# Altium PCB ArmBand-Control-Board.PcbDoc (part 1 of 3)
Units mil, origin at the board's own origin, x right, y up, seen from the top; angles counter-clockwise.
Board outline 1771.65 x 1771.65 mil, 2 copper layers (Top Layer, Bottom Layer), stack 34 mil thick; 107 components, 81 nets, 408 pads, 170 vias.
Unrouted connection lines stored in the file: 5.
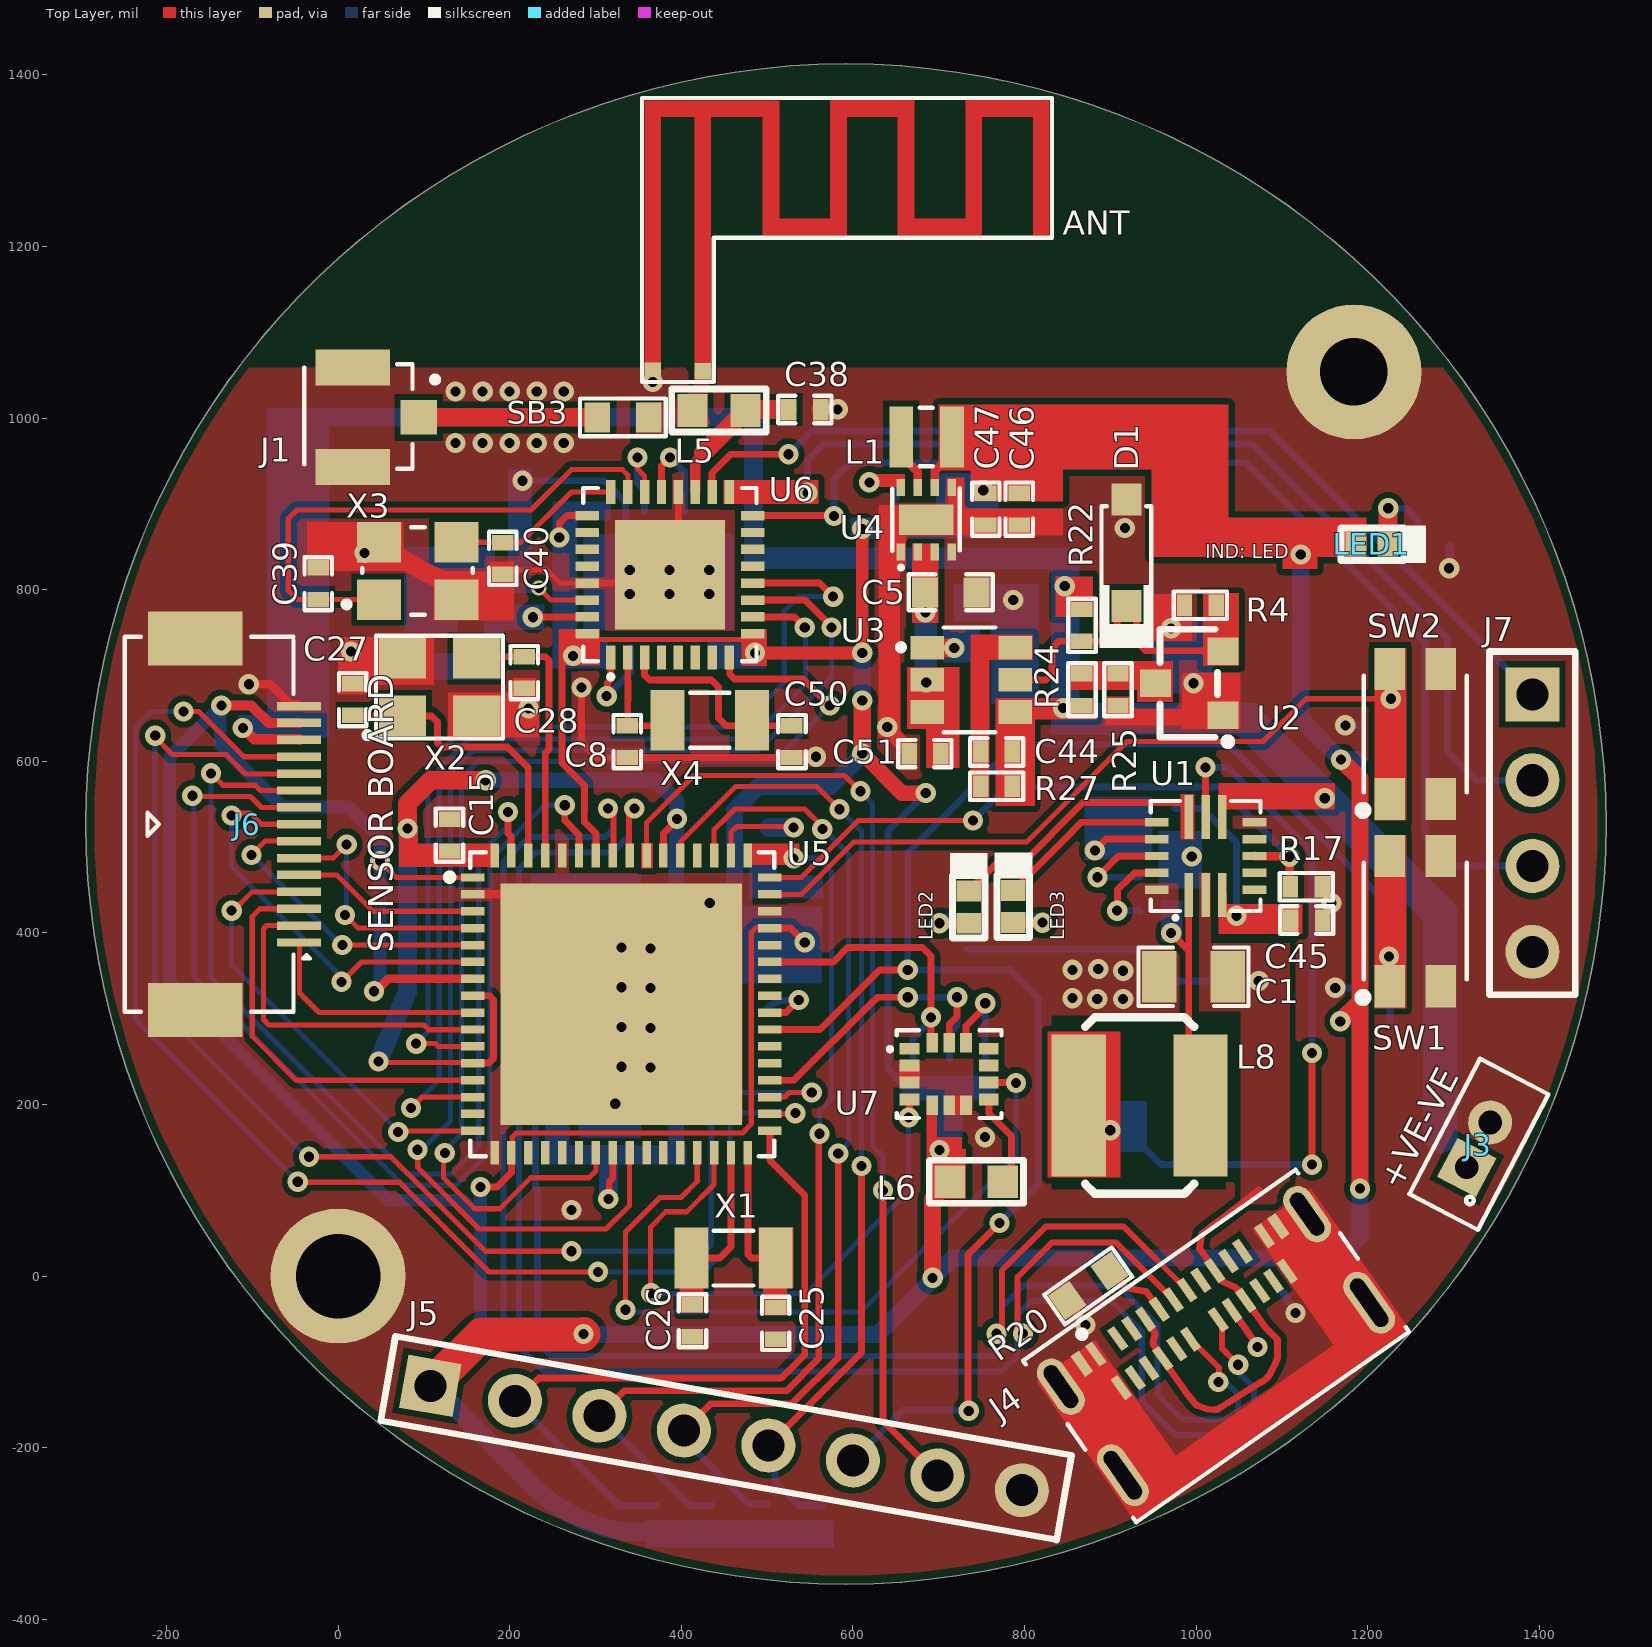
[diagram p0: Top Layer view]
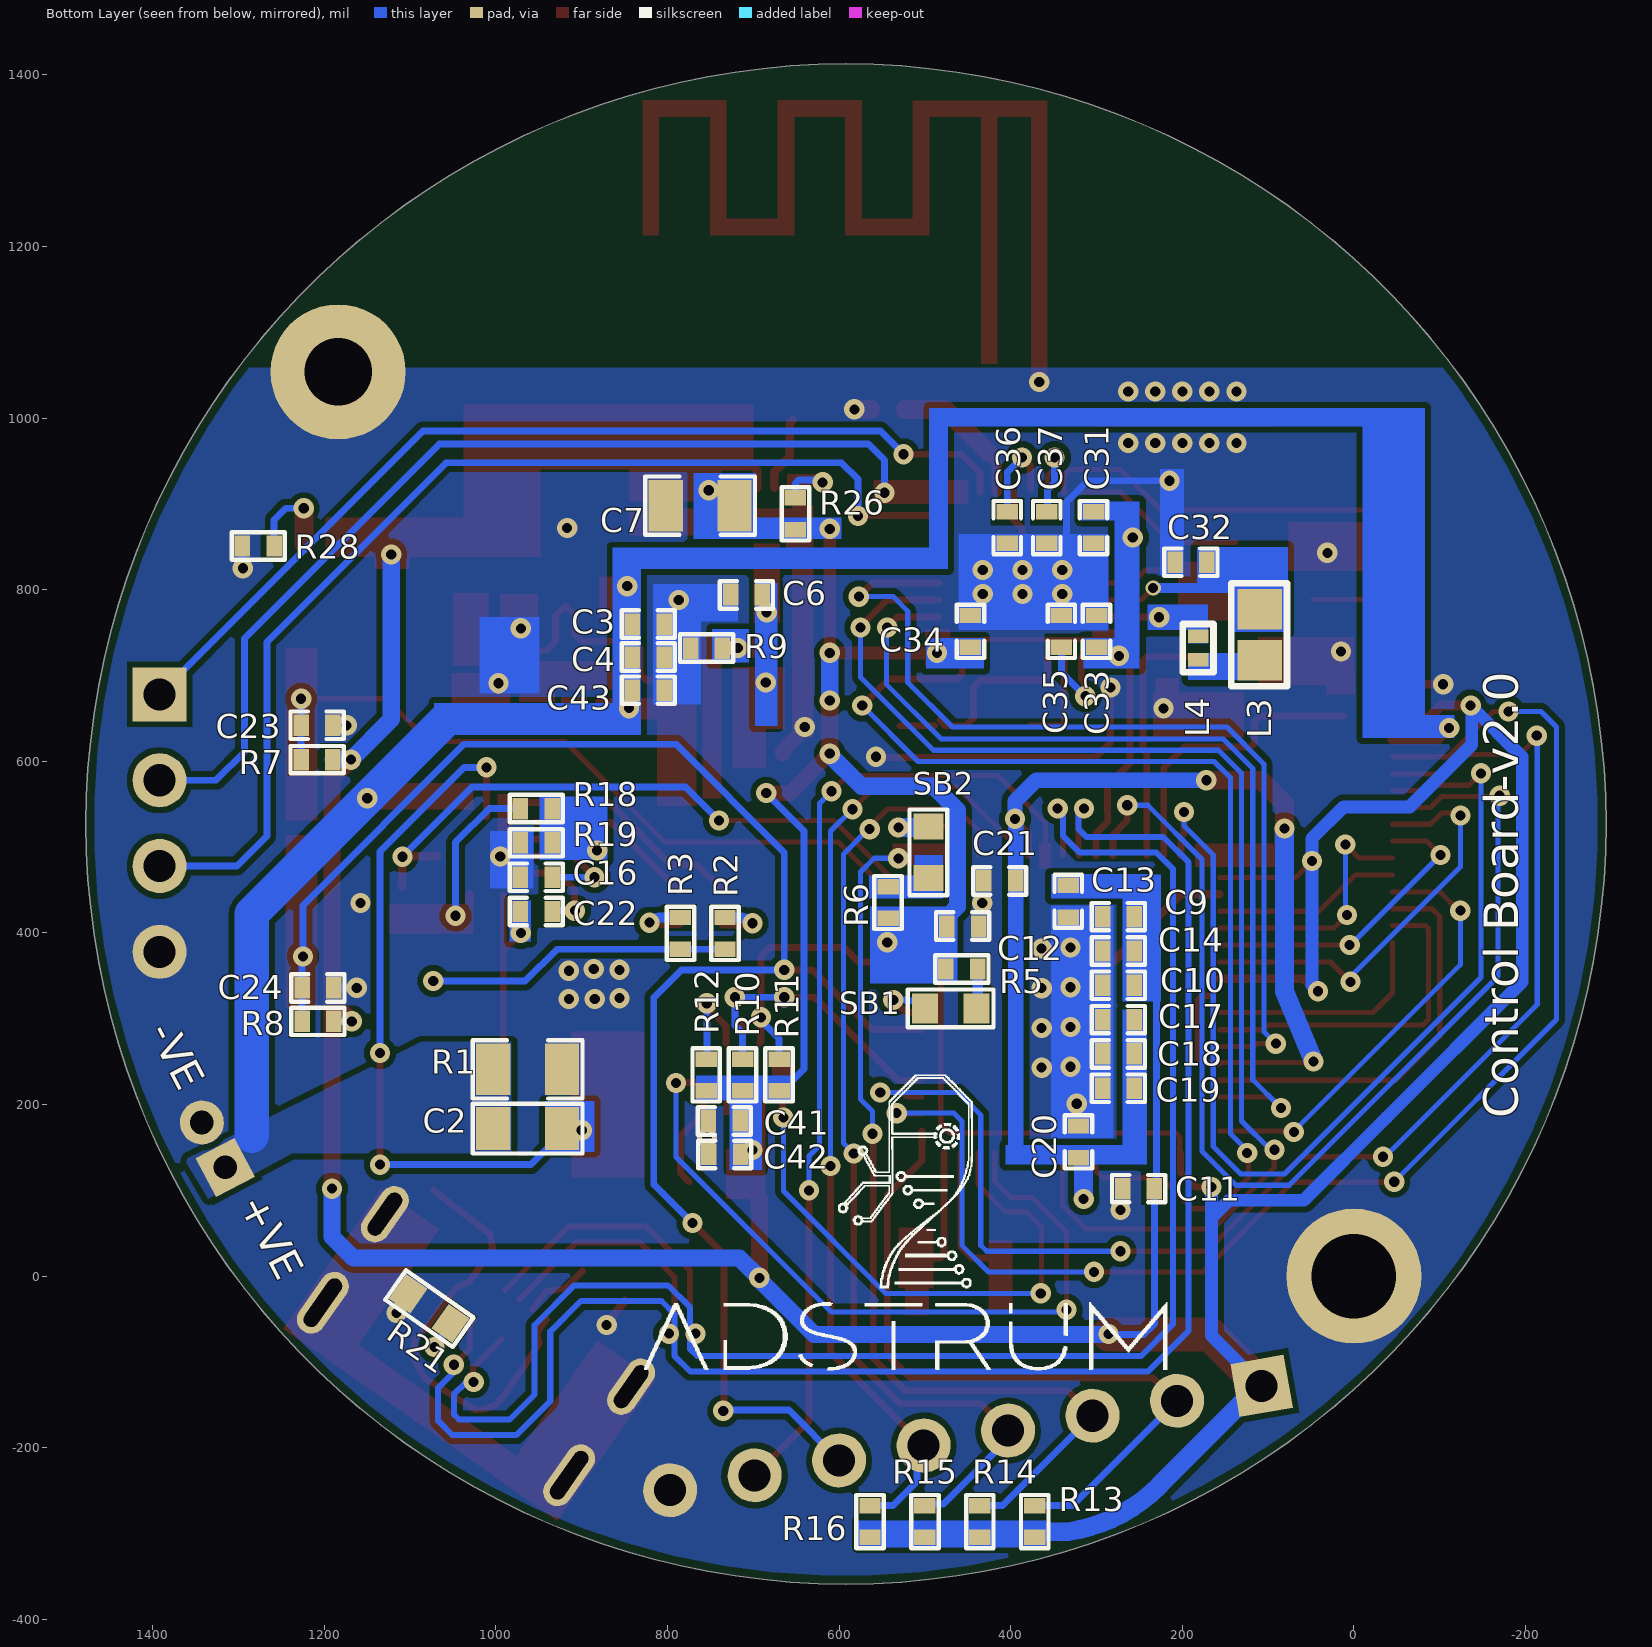
[diagram p1: Bottom Layer view, seen from below]
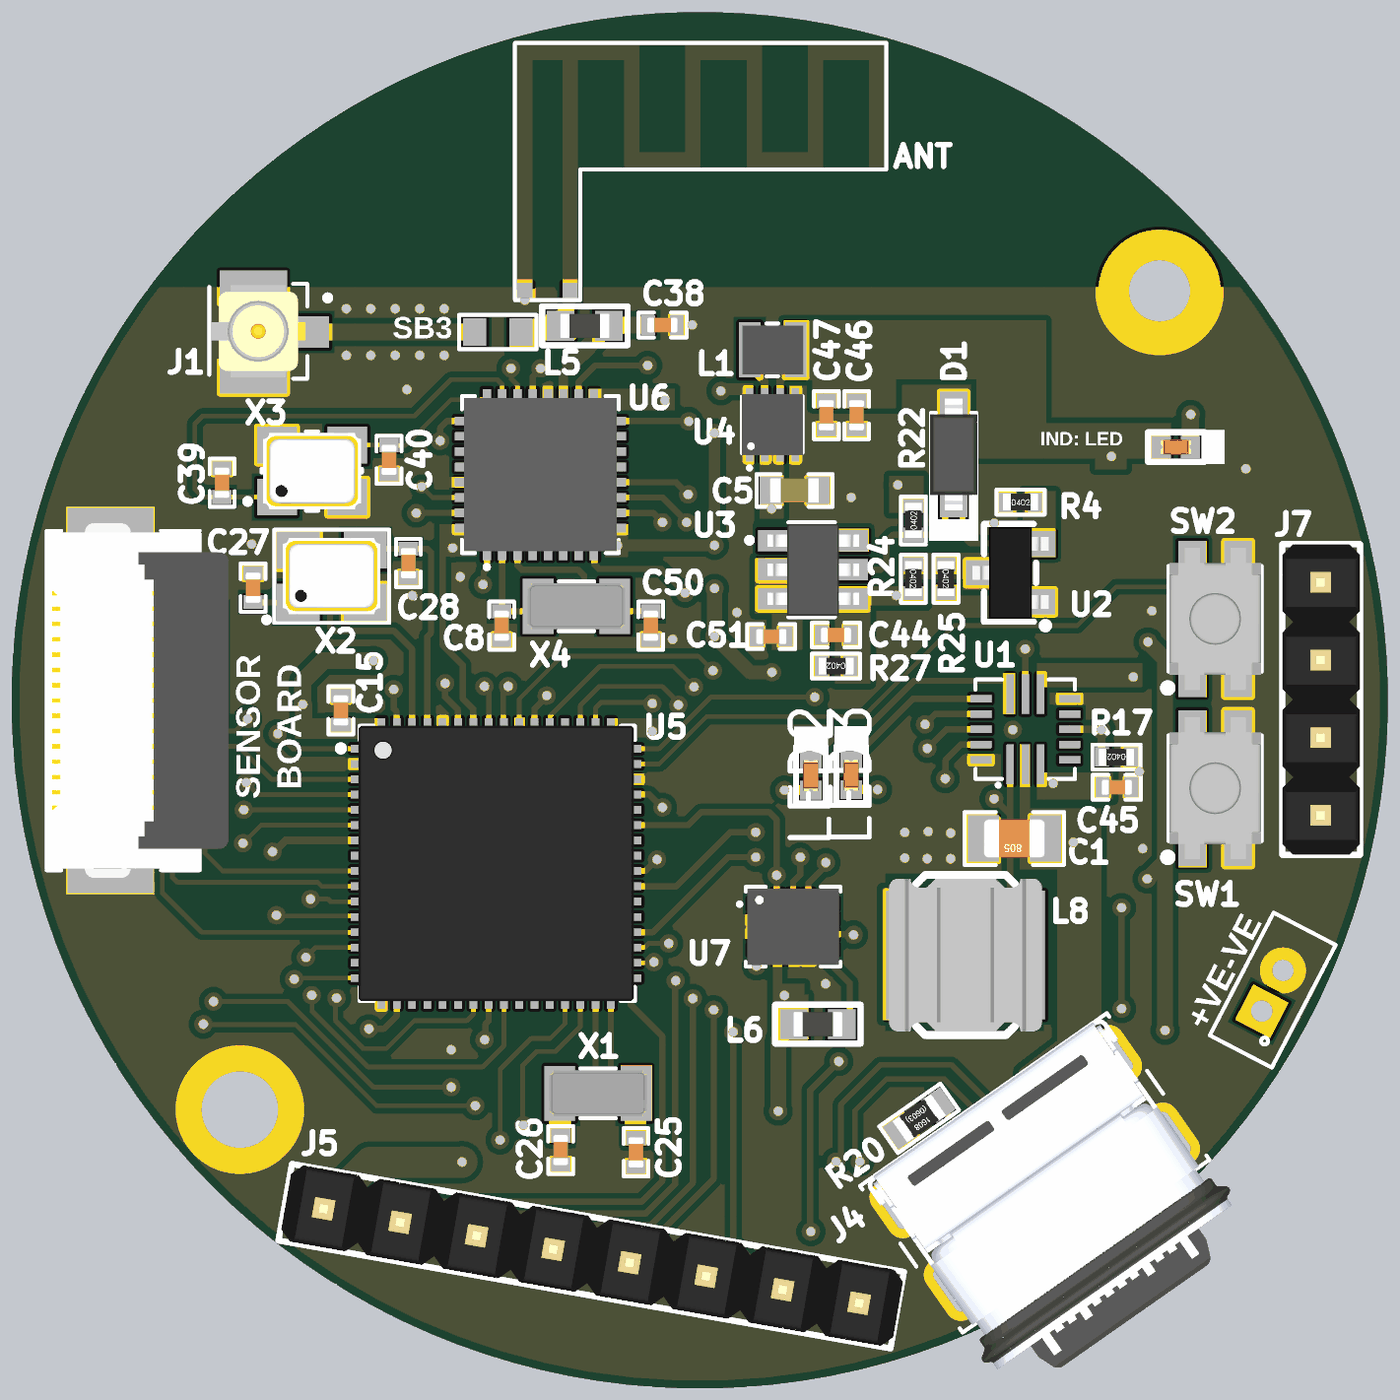
[diagram p3: 3D render of the assembled board from above, using the file's embedded part models]
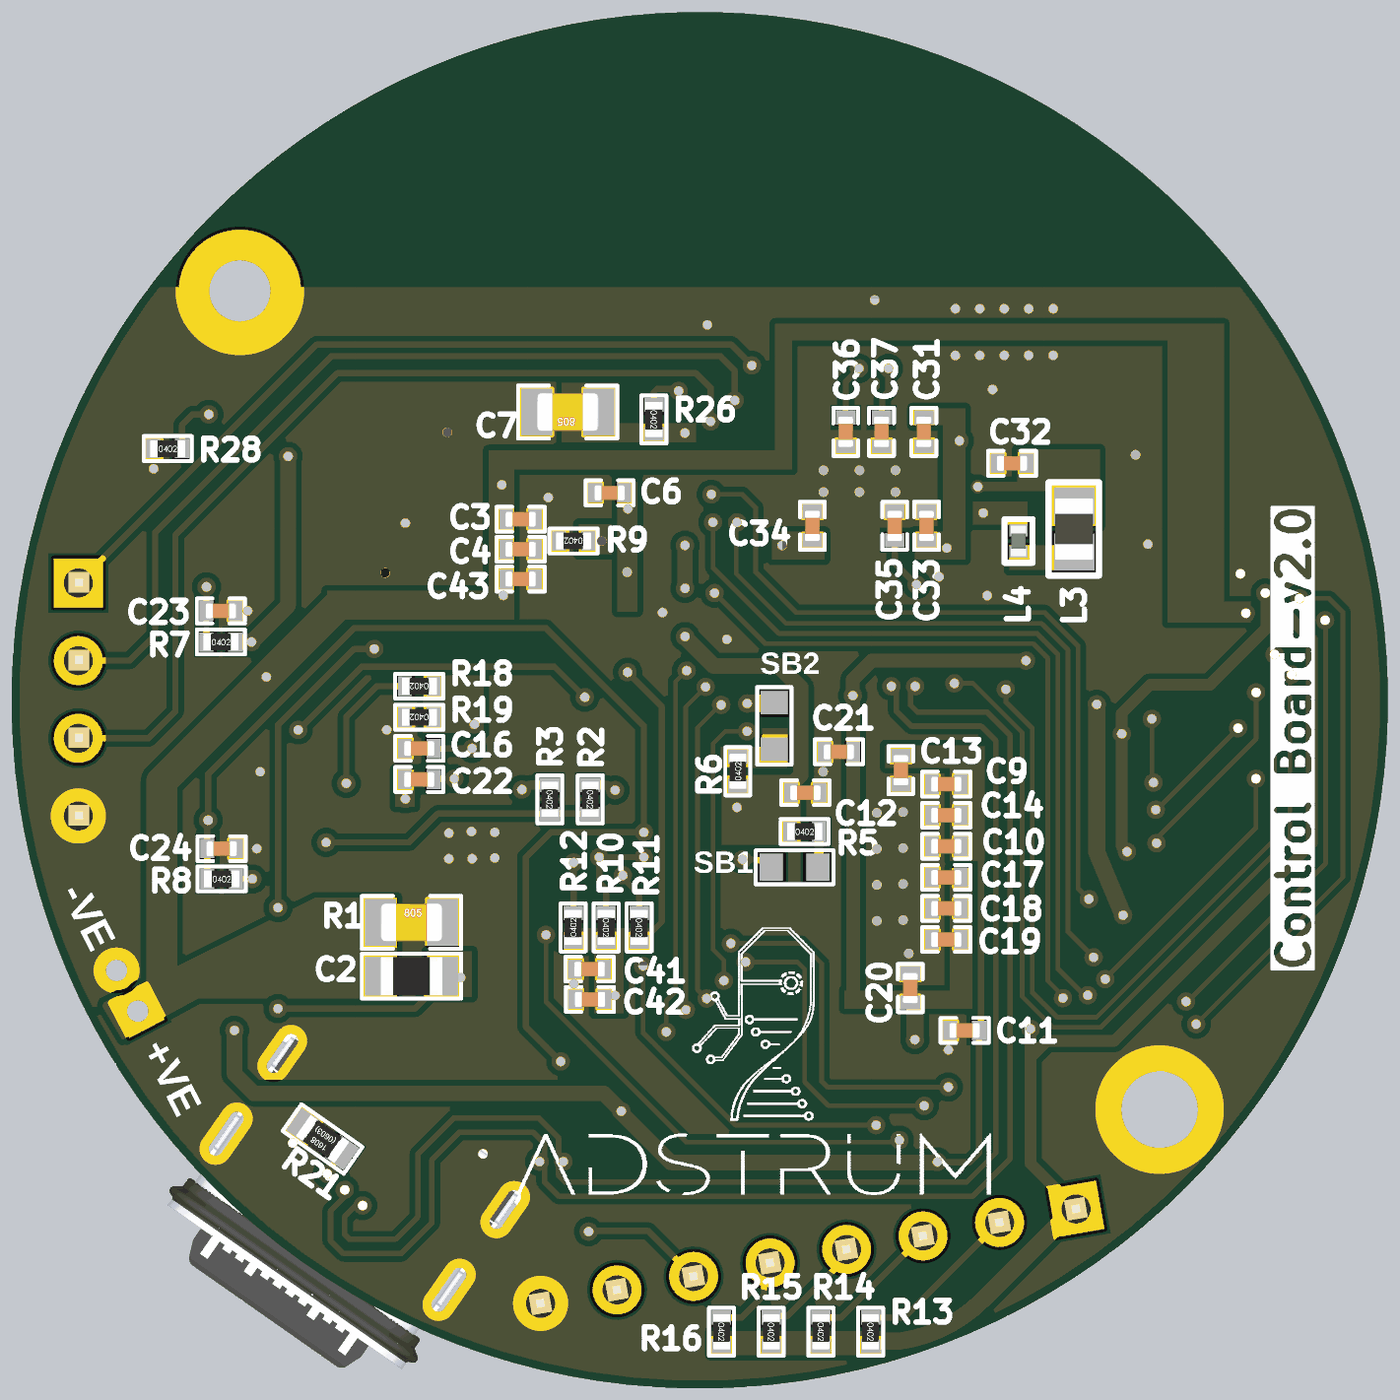
[diagram p4: 3D render of the assembled board from below, using the file's embedded part models]

## Layer stack, top to bottom
Top Solder: solder mask 3, Solder Resist, Dk 3.5
Top Layer: signal copper 9
Dielectric 1: dielectric 16, FR-4, Dk 4.6
Bottom Layer: signal copper 9
Bottom Solder: solder mask 3, Solder Resist, Dk 3.5

## Board outline
-293.83,527 ccw(c592,527) 592,-358.83 ccw(c592,527) 1477.83,527 ccw(c592,527) 592,1412.83 ccw(c592,527)

## Design rules (kind name [scope] priority, off if disabled: settings)
BoardOutlineClearance [All] p1: gap=0 ignorepadtopadclearanceinfootprint=FALSE except(10: Poly-OutlineEdge)
Clearance [All] p1: gap=7 ignorepadtopadclearanceinfootprint=FALSE except(0: Arc-Hole Track-Hole SMDPad-Hole THPad-Hole Via-Hole Fill-Hole Poly-Hole Region-Hole Text-Hole; 4: Arc-SMDPad Track-SMDPad SMDPad-SMDPad)
ComponentClearance [All] p1: gap=0 collisioncheckmode=3 verticalgap=0 showdistances=FALSE
DiffPairsRouting [InDifferentialPairClass('USB_Lines')] p1: maxlimit=11.3 minlimit=11.3 mostfreqgap=11.3 toplayer_minwidth=7 toplayer_maxwidth=7 toplayer_prefwidth=7 bottomlayer_minwidth=7 bottomlayer_maxwidth=7 bottomlayer_prefwidth=7 impedanceprofiledriven=TRUE impedanceprofileid={DB42DCF0-235C-407E-9989-697384F4532C} impedanceprofilevalue=90.000000 maxuncoupledlength=500
HoleToHoleClearance [All] p1: gap=0 allowstackedmicrovias=TRUE
MatchedLengths "Schematic Matched Net Lengths" [InNetClass('USB')] p1: tolerance=50 checknetsindiffpair=TRUE checkdiffpairvsdiffpair=FALSE checkxsignals=FALSE checkothers=FALSE
MaxMinImpedance "Schematic Impedance Constraint" [InNetClass('USB')] p1: minimum=85.00 maximum=90.00
MinimumSolderMaskSliver [All] p1: minsoldermaskwidth=0
PolygonConnect [All] p1: connectstyle=Direct reliefconductorwidth=10 reliefentries=4 polygonreliefangle="90 Angle" airgapwidth=10
RoutingVias [All] p1: holewidth=11.81 width=23.62 viastyle="Through Hole" minholewidth=11.81 minwidth=17.72 maxholewidth=11.81 maxwidth=23.62
SilkToSilkClearance [All] p1: silktosilkclearance=0
SilkToSolderMaskClearance [IsPad] p1: minsilkscreentomaskgap=0 clearancetoexposedcopper=TRUE
SolderMaskExpansion [All] p1: expansion=4 istentingtop=FALSE
Width [All] p1: maxlimit=40 minlimit=6 preferedwidth=22
24 further rules are at their usual default settings.

## Classes and differential pairs
differential pair class USB_Lines: USB_D
net class USB: USB_D_N USB_D_P
component class U_Switching-Regulators: C3 C4 C5 C6 C7 C43 C44 C46 C47 C51 D1 L1 R4 R9 R22 R24 R25 R26 R27 U2 U3 U4
component class U_IMU-Section: C41 C42 L6 R10 R11 R12 U7
component class U_Controller-Section: C9 C10 C11 C12 C13 C14 C15 C17 C18 C19 C20 C21 C23 C24 C25 C26 C27 C28 LED1 R5 R6 R7 R8 R28 S SB1 SB2 SW1 SW2 U5 X1 X2
component class U_Connector-Section: 3 J3 J4 J5 J6 J7 R13 R14 R15 R16 R20 R21 s
component class U_BLE-Section: ANT C8 C31 C32 C33 C34 C35 C36 C37 C38 C39 C40 C50 J1 L3 L4 L5 SB3 U6 X3 X4
component class U_Battery-Charging-Section: C1 C2 C16 C22 C45 L8 LED2 LED3 R1 R2 R3 R17 R18 R19 U1
differential pair USB_D: +USB_D_P -USB_D_N

## Components (designator, comment, footprint, x,y, rotation, side; value= is the part's Value field where it differs from the comment)
ANT "Antenna" ANT# 551,1176 r0 top net-tie
C1 "22uF" Cap0805 997,349 r180 top
C2 "22uF" Cap0805 963,241 r180 bottom
C3 "0.1uF" "Cap 0402" 822.5,760 r180 bottom
C4 "0.1uF" "Cap 0402" 822.5,721.5 r180 bottom
C5 "10uF" Cap0603 714,797 r0 top
C6 "0.1uF" "Cap 0402" 708,794 r0 bottom
C7 "22uF" Cap0805 762,898 r0 bottom
C8 "20pF" "Cap 0402" 337,623 r90 top
C9 "4.7uF" "Cap 0402" 274.5,419 r0 bottom
C10 "0.1uF" "Cap 0402" 274.5,339 r0 bottom
C11 "0.1uF" "Cap 0402" 251,102 r0 bottom
C12 "0.1uF" "Cap 0402" 456,408 r180 bottom
C13 "0.1uF" "Cap 0402" 333,437 r270 bottom
C14 "0.1uF" "Cap 0402" 274.5,379 r0 bottom
C15 "0.1uF" "Cap 0402" 130,514 r90 top
C16 "1uF" "Cap 0402" 953,465 r180 bottom
C17 "2.2uF" "Cap 0402" 274.5,299 r0 bottom
C18 "0.1uF" "Cap 0402" 274.5,259 r0 bottom
C19 "0.1uF" "Cap 0402" 274.5,219 r0 bottom
C20 "0.1uF" "Cap 0402" 321,156.5 r90 bottom
C21 "0.1uF" "Cap 0402" 412.81,460.69 r0 bottom
C22 "0.1uF" "Cap 0402" 953,425 r180 bottom
C23 "0.1uF" "Cap 0402" 1208.5,642 r180 bottom
C24 "0.1uF" "Cap 0402" 1207.5,336 r180 bottom
C25 "20pF" "Cap 0402" 510,-55 r90 top
C26 "20pF" "Cap 0402" 413,-52 r90 top
C27 "20pF" "Cap 0402" 17,672 r270 top
C28 "20pF" "Cap 0402" 217,703.5 r90 top
C31 "0.1uF" "Cap 0402" 303.5,872.5 r270 bottom
C32 "1uF" "Cap 0402" 190,832 r0 bottom
C33 "4.7uF" "Cap 0402" 300,751.5 r90 bottom
C34 "0.1uF" "Cap 0402" 447,751.5 r90 bottom
C35 "0.1uF" "Cap 0402" 341,751.5 r270 bottom
C36 "0.1uF" "Cap 0402" 404,872.5 r90 bottom
C37 "100pF" "Cap 0402" 358,872.5 r270 bottom
C38 "0.8pF" "Cap 0402" 544,1010 r180 top
C39 "20pF" "Cap 0402" -23,807.04 r270 top
C40 "20pF" "Cap 0402" 192,836.5 r90 top
C41 "0.1uF" "Cap 0402" 733.86,180.91 r0 bottom
C42 "0.1uF" "Cap 0402" 733.36,141.91 r0 bottom
C43 "1uF" "Cap 0402" 822.5,683 r180 bottom
C44 "1nF" "Cap 0402" 767.5,611 r0 top
C45 "1uF" "Cap 0402" 1129,415 r0 top
C46 "1uF" "Cap 0402" 794,894 r270 top
C47 "0.1uF" "Cap 0402" 755,894 r270 top
C50 "20pF" "Cap 0402" 529,623 r90 top
C51 "1uF" "Cap 0402" 684,609 r180 top
D1 "MMSZ4689T1G" SOD-123 918.88,843.29 r270 top
J1 "U.FL-R-SMT-1(80)" U.FL-R-SMT-1(80) 57.65,1001 r90 top
J3 "B2B-ZR(LF)(SN)" B2B-ZR(LF)(SN) 1329.14,152.93 r62.5 top
J4 "2305018-2" 2305018-2 1019.81,-76.64 r35 top
J5 "61300811121" HDR1X8 107.56,-127.91 r350 top
J6 "8.01A0.015200" 8.01A0.015200 -106.02,526.68 r270 top locked
J7 "61300411121" HDR1X4 1392,678 r270 top
L1 "2.2uH" MAKK2016T2R2M 686,978 r0 top
L3 "10uH" Ind0805 110,747.5 r90 bottom
L4 "15nH" IND-0402 181.61,732 r90 bottom
L5 "3.9nH" "IND 0603" 444,1009 r0 top
L6 "BLM18PG300SN1D" "IND 0603" 744,110 r0 top
L8 "6.8uH" LVC505040-6R8M-N 934.13,199 r180 top
LED1 "XZVG68W-2" "LED 0402" 1205,853 r0 top
LED2 "XZMDK68W-2" "LED 0402" 735,430 r90 top
LED3 "XZVG68W-2" "LED 0402" 787,430.7 r90 top
R1 "25m" "RES 0805" 963,172 r180 bottom
R2 "1K" Res0402 733,399.5 r270 bottom
R3 "1K" Res0402 785,399.5 r270 bottom
R4 "DNP" Res0402 1005,782 r0 top
R5 "10K" Res0402 457,358 r180 bottom
R6 "10K" Res0402 543,435.5 r90 bottom
R7 "100K" Res0402 1208.5,602 r180 bottom
R8 "100K" Res0402 1207.5,297 r180 bottom
R9 "1K" Res0402 754.5,732 r0 bottom
R10 "4.7K" Res0402 712.5,234.5 r270 bottom
R11 "4.7K" Res0402 670,234.5 r270 bottom
R12 "10K" Res0402 755,234.5 r90 bottom
R13 "100K" Res0402 372,-286 r270 bottom
R14 "100K" Res0402 436,-286 r270 bottom
R15 "100K" Res0402 500,-286 r270 bottom
R16 "100K" Res0402 564,-286 r270 bottom
R17 "100K" Res0402 1128.4,453.96 r180 top
R18 "10K" Res0402 953,545 r0 bottom
R19 "10K" Res0402 953,505 r0 bottom
R20 "5.1K" Res0603 874.43,-11.21 r35 top
R21 "5.1K" Res0603 1077.57,-37.79 r215 bottom
R22 "10K" Res-0402 867,758.5 r90 top
R24 "DNP" Res0402 867,683.5 r270 top
R25 "DNP" Res0402 909,683.5 r270 top
R26 "100K" Res0402 651,888.5 r270 bottom
R27 "10K" Res0402 767.5,571 r180 top
R28 "1K" Res0402 1277,851 r180 bottom
SB1 "Solder Bridge" "Solder Bridge" 470,312 r180 bottom
SB2 "Solder Bridge" "Solder Bridge" 496,494 r270 bottom
SB3 "Solder Bridge" "Solder Bridge" 332,1001 r180 top
SW1 "TS-1185EC-C-D-B" TS-1185EC-C-D-B 1255.47,413.79 r90 top
SW2 "TS-1185EC-C-D-B" TS-1185EC-C-D-B 1255.47,631.79 r90 top
U1 "MP2615CGQ-Z" QFN(3X3) 1011.09,489.68 r90 top
U2 "DNP" SOT-23 992,691 r90 top
U3 "FDC6330L" SuperSOT™-6 738,695 r0 top
U4 "TPS62162DSGR" "8-WSON (2x2)" 685.53,881.6 r90 top
U5 "ATSAM4S8BA-MU" QFN64 330,317 r0 top
U6 "NRF52810-QCAA-R" "32 QFN" 386.79,817.54 r90 top
U7 "LSM6DSRTR" "14-LGA (2.5x3)" 712.26,235.53 r0 top
X1 "32.768kHz" X321532768KGD2SI 461,21 r180 top
X2 "16MHz" X322516MOB4SI 118.31,686.54 r0 top
X3 "32MHz" XC32M4-32.000-F12NLDT 93,822 r0 top
X4 "32.768kHz" X321532768KGD2SI 433.21,648 r0 top

## Footprints (in the part's own frame and the unit in brackets; to place one, negate y for a bottom-side part, rotate by r counter-clockwise, add the part's x,y. Pads: shape width x height; smd on the part's side, far side on the other; paste and mask are expansions set on the pad)
"8-WSON (2x2)" [mm] "IC REG BUCK 3.3V 1A 8WSON"
  rect 0.5x0.25 smd: 1(-0.95,0.75) 2(-0.95,0.25) 3(-0.95,-0.25) 4(-0.95,-0.75) 5(0.95,-0.75) 6(0.95,-0.25) 7(0.95,0.25) 8(0.95,0.75)
  rect 0.9x1.6 smd: 9(0,0)
  silkscreen extent -1.43,-0.99 0.93,1, body extent -1,-1 1,1, height 0.8
8.01A0.015200 [mm]
  rect 0.25x1.3 smd paste+0 mask+0.05: 1(3.5,1.54) 2(3,1.54) 3(2.5,1.54) 4(2,1.54) 5(1.5,1.54) 6(1,1.54) 7(0.5,1.54) 8(0,1.54) 9(-0.5,1.54) 10(-1,1.54) 11(-1.5,1.54) 12(-2,1.54) 13(-2.5,1.54) 14(-3,1.54) 15(-3.5,1.54)
  rect 1.6x2.8 smd paste+0 mask+0.05: MP1(-5.5,-1.54) MP2(5.5,-1.54)
  silkscreen extent -5.55,-3.63 5.55,1.86, body extent -5.8,-3.58 5.8,2.32, height 2.02
"14-LGA (2.5x3)" [mm]
  rect 0.58x0.35 smd: 1(-1.175,0.75) 2(-1.175,0.25) 3(-1.175,-0.25) 4(-1.175,-0.75) 8(1.175,-0.75) 9(1.175,-0.25) 10(1.175,0.25) 11(1.175,0.75)
  rect 0.35x0.58 smd: 5(-0.5,-0.925) 6(0,-0.925) 7(0.5,-0.925) 12(0.5,0.925) 13(0,0.925) 14(-0.5,0.925)
  silkscreen extent -1.81,-1.3 1.55,1.3, body extent -1.5,-1.25 1.5,1.25, height 0.87
"32 QFN" [mm] "32pins, 5x5mm body, 0.5mm pitch QFN package"
  rect 0.7x0.28 smd: 1(-2.45,1.75) 2(-2.45,1.25) 3(-2.45,0.75) 4(-2.45,0.25) 5(-2.45,-0.25) 6(-2.45,-0.75) 7(-2.45,-1.25) 8(-2.45,-1.75) 17(2.45,-1.75) 18(2.45,-1.25) 19(2.45,-0.75) 20(2.45,-0.25) 21(2.45,0.25) 22(2.45,0.75) 23(2.45,1.25) 24(2.45,1.75)
  rect 0.28x0.7 smd: 9(-1.75,-2.45) 10(-1.25,-2.45) 11(-0.75,-2.45) 12(-0.25,-2.45) 13(0.25,-2.45) 14(0.75,-2.45) 15(1.25,-2.45) 16(1.75,-2.45) 25(1.75,2.45) 26(1.25,2.45) 27(0.75,2.45) 28(0.25,2.45) 29(-0.25,2.45) 30(-0.75,2.45) 31(-1.25,2.45) 32(-1.75,2.45)
  rect 3.254x3.254 smd: 33(0,0)
  Top Layer region: -0.635,-0.635 0.635,-0.635 0.635,0.635 -0.635,0.635
  silkscreen extent -3.1,-2.57 2.57,2.57, body extent -2.5,-2.5 2.5,2.5, height 0.85
2305018-2 [mm]
  rect 0.25x0.75 smd: A1(-3.05,1.7) A2(-2.25,1.7) A3(-1.75,1.7) A4(-1.25,1.7) A5(-0.75,1.7) A6(-0.25,1.7) A7(0.25,1.7) A8(0.75,1.7) A9(1.25,1.7) A10(1.75,1.7) A11(2.25,1.7) A12(3.05,1.7) B1(3,0.45) B2(2.5,0.45) B3(2,0.45) B4(1.5,0.45) B5(1,0.45) B6(0.5,0.45) B7(-0.5,0.45) B8(-1,0.45) B9(-1.5,0.45) B10(-2,0.45) B11(-2.5,0.45) B12(-3,0.45)
  rect 0.3x0.75 smd: G1(-3.55,1.7) G2(3.55,1.7)
  oval 0.85x2.05 hole 0.45 slot 1.65 at 90 deg: S1(-4.45,-1.7) S2(4.45,-1.7)
  oval 0.85x1.85 hole 0.45 slot 1.45 at 90 deg: S3(4.45,1.5) S4(-4.45,1.5)
  silkscreen extent -4.93,-3.08 4.93,2.78, body extent -4.92,-5.86 4.92,2.79, height 3.53
ANT# [mm]
  rect 0.5x0.5 smd: ANT#(-3.2,-3.08) GND(-4.678,-3.079)
  Top Layer region: -3.45,-2.86 -2.95,-2.86 -2.95,4.94 -3.45,4.94
  Top Layer region: -4.928,-2.859 -4.428,-2.859 -4.428,4.941 -4.928,4.941
  Top Layer region: 0.572,4.941 0.572,4.441 3.072,4.441 3.072,4.941
  Top Layer region: 4.572,4.941 4.572,4.441 7.072,4.441 7.072,4.941
  Top Layer region: -4.928,4.941 -4.928,4.441 -0.928,4.441 -0.928,4.941
  Top Layer region: 6.572,0.941 7.072,0.941 7.072,4.941 6.572,4.941
  Top Layer region: 1.072,4.941 0.572,4.941 0.572,0.941 1.072,0.941
  Top Layer region: -1.428,0.941 -0.928,0.941 -0.928,4.941 -1.428,4.941
  Top Layer region: 1.072,0.941 1.072,1.441 -1.428,1.441 -1.428,0.941
  Top Layer region: 5.072,0.941 5.072,1.441 2.572,1.441 2.572,0.941
  Top Layer region: 2.572,0.941 3.072,0.941 3.072,4.941 2.572,4.941
  Top Layer region: 5.072,4.941 4.572,4.941 4.572,0.941 5.072,0.941
  silkscreen extent -5,-3.4 7.14,5.01
B2B-ZR(LF)(SN) [mm]
  rect 1.3x1.3 hole 0.7: 1(-0.75,0)
  round 1.3 hole 0.7: 2(0.75,0)
  silkscreen extent -2.24,-1.14 2.29,1.14
Cap0603 [mil]
  rect 30x35 smd mask+2.36: 1(-30,0) 2(30,0)
  silkscreen extent -49,-21 49,21, body extent -32,-16 31,16, height 34
Cap0805 [mil] "SMD 0805"
  rect 40x60 smd mask+2.76: 1(-40,0) 2(40,0)
  silkscreen extent -64,-34 64,34, body extent -39,-25 39,25, height 30
"Cap 0402" [mil]
  rect 18x25 smd mask+2.36: 1(-18.5,0) 2(18.5,0)
  silkscreen extent -31,-16 31,16, body extent -20,-10 20,10, height 19
HDR1X4 [mm] "Connector; Header; 4 Position"
  rect 1.6x1.6 hole 0.95: 1(0,0)
  round 1.6 hole 0.95: 2(2.54,0) 3(5.08,0) 4(7.62,0)
  silkscreen extent -1.27,-1.27 8.89,1.27, body extent -1.27,-1.27 8.89,1.27, height 9.5
HDR1X8 [mm] "Connector; Header; 8 Position"
  rect 1.6x1.6 hole 0.95: 1(0,0)
  round 1.6 hole 0.95: 2(2.54,0) 3(5.08,0) 4(7.62,0) 5(10.16,0) 6(12.7,0) 7(15.24,0) 8(17.78,0)
  silkscreen extent -1.27,-1.27 19.05,1.27, body extent -1.24,-1.24 19.08,1.3, height 9.4
Ind0805 [mm] "Inductor 0805"
  rect 1.2x1.32 smd: 1(-0.75,0) 2(0.75,0)
  silkscreen extent -1.52,-0.81 1.52,0.84, body extent -1,-0.62 1,0.63, height 0.47
"IND 0603" [mm]
  rect 0.9x0.97 smd: 1(-0.785,0) 2(0.785,0)
  silkscreen extent -1.4,-0.64 1.4,0.64, body extent -0.8,-0.4 0.8,0.4, height 0.78
IND-0402 [mm]
  rect 0.4x0.6 smd: 1(-0.35,0) 2(0.35,0)
  silkscreen extent -0.71,-0.46 0.71,0.46, body extent -0.5,-0.25 0.5,0.25, height 0.25
"LED 0402" [mm]
  rect 0.62x0.72 smd: 1(-0.475,0) 2(0.475,0)
  silkscreen extent -0.91,-0.56 1.6,0.56, body extent -0.5,-0.25 0.51,0.25, height 0.45
LVC505040-6R8M-N [mm]
  rect 1.6x4.2 smd: 1(-1.8,0) 2(1.8,0)
  silkscreen extent -1.61,-2.62 1.61,2.62, body extent -2.5,-2.5 2.5,2.5, height 2
MAKK2016T2R2M [mm]
  rect 0.7x1.8 smd: 1(-0.75,0) 2(0.75,0)
  silkscreen extent -0.2,-0.86 0.18,0.86, body extent -1,-0.8 1,0.8, height 1
QFN64 [mm]
  rect 0.7x0.25 smd: 1(-4.4,3.75) 2(-4.4,3.25) 3(-4.4,2.75) 4(-4.4,2.25) 5(-4.4,1.75) 6(-4.4,1.25) 7(-4.4,0.75) 8(-4.4,0.25) 9(-4.4,-0.25) 10(-4.4,-0.75) 11(-4.4,-1.25) 12(-4.4,-1.75) 13(-4.4,-2.25) 14(-4.4,-2.75) 15(-4.4,-3.25) 16(-4.4,-3.75) 33(4.4,-3.75) 34(4.4,-3.25) 35(4.4,-2.75) 36(4.4,-2.25) 37(4.4,-1.75) 38(4.4,-1.25) 39(4.4,-0.75) 40(4.4,-0.25) 41(4.4,0.25) 42(4.4,0.75) 43(4.4,1.25) 44(4.4,1.75) 45(4.4,2.25) 46(4.4,2.75) 47(4.4,3.25) 48(4.4,3.75)
  rect 0.25x0.7 smd: 17(-3.75,-4.4) 18(-3.25,-4.4) 19(-2.75,-4.4) 20(-2.25,-4.4) 21(-1.75,-4.4) 22(-1.25,-4.4) 23(-0.75,-4.4) 24(-0.25,-4.4) 25(0.25,-4.4) 26(0.75,-4.4) 27(1.25,-4.4) 28(1.75,-4.4) 29(2.25,-4.4) 30(2.75,-4.4) 31(3.25,-4.4) 32(3.75,-4.4) 49(3.75,4.4) 50(3.25,4.4) 51(2.75,4.4) 52(2.25,4.4) 53(1.75,4.4) 54(1.25,4.4) 55(0.75,4.4) 56(0.25,4.4) 57(-0.25,4.4) 58(-0.75,4.4) 59(-1.25,4.4) 60(-1.75,4.4) 61(-2.25,4.4) 62(-2.75,4.4) 63(-3.25,4.4) 64(-3.75,4.4)
  rect 7.15x7.15 smd: 65(0,0)
  silkscreen extent -5.18,-4.5 4.54,4.5, body extent -4.52,-4.52 4.52,4.52, height 0.9
QFN(3X3) [mm]
  rect 1.3x0.25 smd: 1(-1.15,0.5) 2(-1.15,0) 3(-1.15,-0.5) 9(1.15,-0.5) 10(1.15,0) 11(1.15,0.5)
  rect 0.25x0.7 smd: 4(-1,-1.45) 5(-0.5,-1.45) 6(0,-1.45) 7(0.5,-1.45) 8(1,-1.45) 12(1,1.45) 13(0.5,1.45) 14(0,1.45) 15(-0.5,1.45) 16(-1,1.45)
  silkscreen extent -1.88,-1.63 1.63,1.63, body extent -1.55,-1.55 1.55,1.55, height 0.94
Res0402 [mil]
  rect 18x25 smd mask+4: 1(-18.5,0) 2(18.5,0)
  silkscreen extent -32,-17 32,16, body extent -23,-11 23,11, height 16
Res0603 [mil]
  rect 30x35 smd: 1(-30,0) 2(30,0)
  silkscreen extent -48,-21 48,21, body extent -31,-17 31,17, height 18
"RES 0805" [mil] "SMD 0805"
  rect 40x50 smd: 1(-40,0) 2(40,0)
  silkscreen extent -64,-29 64,29, body extent -39,-25 39,24, height 24
Res-0402 [mil]
  rect 18x25 smd mask+2.17: 1(-18.5,0) 2(18.5,0)
  silkscreen extent -32,-17 32,16, body extent -23,-11 23,11, height 16
SOD-123 [mm]
  rect 0.95x0.9 smd: 1(-1.575,0) 2(1.575,0)
  silkscreen extent -1.37,-0.8 2.82,0.8, body extent -1.82,-0.78 1.83,0.78, height 1.5
"Solder Bridge" [mil] "Solder Bridge ON"
  rect 30x35 smd: 1(-30,0) 2(30,0)
  silkscreen extent -50,-22 50,22
SOT-23 [mm] "TRANS NPN 40V 0.6A SOT23"
  rect 0.82x0.92 smd: 1(-0.95,-1) 2(0.95,-1) 3(0,1)
  silkscreen extent -1.82,-1.23 1.6,0.86, body extent -1.5,-1.25 1.5,1.25, height 1.05
SuperSOT™-6 [mm]
  rect 1x0.7 smd: 1(-1.3,0.95) 2(-1.3,0) 3(-1.3,-0.95) 4(1.3,-0.95) 5(1.3,0) 6(1.3,0.95)
  silkscreen extent -2.13,-1.55 0.71,1.55, body extent -1.5,-1.5 1.5,1.5, height 1.05
TS-1185EC-C-D-B [mm]
  rect 1.25x0.9 smd: 1(-1.925,0.75) 1(1.925,0.75) 2(-1.925,-0.75) 2(1.925,-0.75)
  silkscreen extent -2.39,-1.52 1.73,1.68, body extent -2.33,-1.5 2.32,1.5, height 2
U.FL-R-SMT-1(80) [mm]
  rect 1.02x1.07 smd: 1(0,-0.923)
  rect 1.07x2.2 smd: 2(1.475,1.025) 3(-1.475,1.025)
  silkscreen extent -1.52,-0.74 1.57,2.46, body extent -1.47,-0.69 1.53,2.41, height 1.2
X322516MOB4SI [mm] "16MHz SMD Crystal Resonator 12pF"
  rect 1.4x1.2 smd: 1(-1.1,-0.85) 2(1.1,-0.85) 3(1.1,0.85) 4(-1.1,0.85)
  silkscreen extent -2.18,-1.52 1.88,1.52, body extent -1.61,-1.24 1.59,1.26, height 0.82
X321532768KGD2SI [mm]
  rect 1x1.8 smd: 1(-1.25,0) 2(1.25,0)
  silkscreen extent -0.58,-0.81 0.58,0.81, body extent -1.6,-0.75 1.6,0.75, height 0.9
XC32M4-32.000-F12NLDT [mm]
  rect 1.3x1.2 smd: 1(-1.15,-0.85) 2(1.15,-0.85) 3(1.15,0.85) 4(-1.15,0.85)
  silkscreen extent -2.16,-1.3 1.63,1.3, body extent -1.6,-1.25 1.6,1.25, height 0.82

## Part data
C1 C2: library part GRM21BR61E226ME44L, "0805 22 uF 25 V ±20% Tolerance X5R SMT Multilayer Ceramic Capacitor", Case Code (Imperial)=0805, Case Code (Metric)=2012, Dielectric=X5R, Manufacturer=Murata, Max Operating Temperature=85°C, Min Operating Temperature=-55°C, Package Quantity=3000, Resistor Type=Ceramic, Tolerance=20%, Voltage=25V, Capacitance=22uF, Case/Package=0805, Category="Ceramic Capacitors", ComponentLink1Description=https://datasheet.ciiva.com/22787/1747471-22787265.pdf?src-supplier=Farnell, ComponentLink1URL=https://datasheet.ciiva.com/22787/1747471-22787265.pdf?src-supplier=Farnell, ComponentLink2Description=https://datasheet.ciiva.com/7719/1747471-7719095.pdf?src-supplier=Element14, ComponentLink2URL=https://datasheet.ciiva.com/7719/1747471-7719095.pdf?src-supplier=Element14, ComponentLink3Description=https://datasheet.ciiva.com/28584/1747471-28584199.pdf?src-supplier=Element14, ComponentLink3URL=https://datasheet.ciiva.com/28584/1747471-28584199.pdf?src-supplier=Element14, Construction=Flat, Depth=1.25mm, Height=1.25mm, Lead Free="Lead Free", Length=2mm, Manufacturer Part Number=GRM21BR61E226ME44L, Material=Ceramic, Mount="Surface Mount", Packaging="Tape and Reel", Pricing 1="1=0.45930, 10=0.35000, 25=0.33950, 50=0.26910, 100=0.22090, 250=0.21320, 500=0.16760, 1000=0.14640, 3000=0.11710, 6000=0.10550, 15000=0.10450 (USD)", REACH SVHC="No SVHC", RoHS=Yes, RoHS Compliant=Yes, Series=GRM, Stock 1=21193, Supplier 1="Arrow Electronics", Supplier Part Number 1=GRM21BR61E226ME44L, Termination=SMD/SMT, Thickness=0.057inch, Voltage Rating=25V, Voltage Rating (DC)=25V, Weight=0.000335oz, Width=1.25mm
C3 C4 C6 C10 C11 C12 C13 C14 C15 C18 C19 C20 C21 C22 C23 C24 C31 C34 C35 C36 C41 C42 C47: library part GRM155R71H104ME14D, "CAP CER 0.1UF 50V X7R 0402", Capacitance=100nF, Case/Package=0402, Manufacturer=Murata, Max Operating Temperature=125°C, Min Operating Temperature=-55°C, Supplier Part Number 1=490-10701-1-ND, Tolerance=20%, Voltage Rating=50V, ComponentLink1Description=http://search.murata.co.jp/Ceramy/image/img/A01X/G101/ENG/GRM155R71H104ME14-01.pdf?src-supplier=Digi-Key, ComponentLink1URL=http://search.murata.co.jp/Ceramy/image/img/A01X/G101/ENG/GRM155R71H104ME14-01.pdf?src-supplier=Digi-Key, ComponentLink2Description=http://psearch.en.murata.com/capacitor/product/GRM155R71H104ME14%23.pdf?src-supplier=Avnet, ComponentLink2URL=http://psearch.en.murata.com/capacitor/product/GRM155R71H104ME14%23.pdf?src-supplier=Avnet, ComponentLink3Description=http://components.arrow.com/part/dataview/0323_07177683?src-supplier=Arrow+Europe, ComponentLink3URL=http://components.arrow.com/part/dataview/0323_07177683?src-supplier=Arrow+Europe, ComponentLink4Description=http://www.mouser.com/ds/2/281/c02e-2905.pdf?src-supplier=Mouser, ComponentLink4URL=http://www.mouser.com/ds/2/281/c02e-2905.pdf?src-supplier=Mouser, Length=0.039inch, Manufacturer Part Number=GRM155R71H104ME14D, Mount="Surface Mount", Packaging="Cut Tape", Pricing 1="1=0.1, 10=0.038, 100=0.0168, 500=0.01198, 1000=0.00941, 2500=0.00855, 5000=0.00787 (USD)", Stock 1=439844, Supplier 1=Digi-Key, Thickness=0.022inch, Width=0.02inch
C5: library part CL10A106MA8NRNC, "CAP CER 10UF 25V X5R 0603", Case Code (Imperial)=0603, Case Code (Metric)=1608, Dielectric=X5R, Manufacturer=Samsung, Max Operating Temperature=85°C, Min Operating Temperature=-55°C, Package Quantity=1, Tolerance=20%, Voltage Rating=25V, Capacitance=10uF, Case/Package=0603, Category="Ceramic Capacitors", ComponentLink1Description=https://datasheet.ciiva.com/25766/cl10a106ma8nrnc-25766562.pdf?src-supplier=Digi-Key, ComponentLink1URL=https://datasheet.ciiva.com/25766/cl10a106ma8nrnc-25766562.pdf?src-supplier=Digi-Key, Construction=Flat, Contact Plating=Tin, Lead Free="Lead Free", Length=0.063inch, Manufacturer Part Number=CL10A106MA8NRNC, Mount="Surface Mount", Packaging="Tape and Reel", Pricing 1="4000=0.03753, 8000=0.03700, 16000=0.03595, 24000=0.03515, 32000=0.03383, 40000=0.03304, 400000=0.03225 (USD)", RoHS=Yes, RoHS Compliant=Yes, Series=CL, Supplier 1=Avnet, Supplier Part Number 1=CL10A106MA8NRNC, Termination=Wraparound, Thickness=0.035inch, Width=0.031inch
C7: library part GRM21BR61E226ME44L, "CAP CER 22UF 25V X5R 0805", Case Code (Imperial)=0805, Case Code (Metric)=2012, Dielectric=X5R, Manufacturer=Murata, Max Operating Temperature=85°C, Min Operating Temperature=-55°C, Package Quantity=3000, Resistor Type=Ceramic, Tolerance=20%, Voltage=25V, Capacitance=22uF, Case/Package=0805, Category="Ceramic Capacitors", ComponentLink1Description=https://datasheet.ciiva.com/22787/1747471-22787265.pdf?src-supplier=Farnell, ComponentLink1URL=https://datasheet.ciiva.com/22787/1747471-22787265.pdf?src-supplier=Farnell, ComponentLink2Description=https://datasheet.ciiva.com/7719/1747471-7719095.pdf?src-supplier=Element14, ComponentLink2URL=https://datasheet.ciiva.com/7719/1747471-7719095.pdf?src-supplier=Element14, ComponentLink3Description=https://datasheet.ciiva.com/28584/1747471-28584199.pdf?src-supplier=Element14, ComponentLink3URL=https://datasheet.ciiva.com/28584/1747471-28584199.pdf?src-supplier=Element14, Construction=Flat, Depth=1.25mm, Height=1.25mm, Lead Free="Lead Free", Length=2mm, Manufacturer Part Number=GRM21BR61E226ME44L, Material=Ceramic, Mount="Surface Mount", Packaging="Tape and Reel", Pricing 1="1=0.45930, 10=0.35000, 25=0.33950, 50=0.26910, 100=0.22090, 250=0.21320, 500=0.16760, 1000=0.14640, 3000=0.11710, 6000=0.10550, 15000=0.10450 (USD)", REACH SVHC="No SVHC", RoHS=Yes, RoHS Compliant=Yes, Series=GRM, Stock 1=21193, Supplier 1="Arrow Electronics", Supplier Part Number 1=GRM21BR61E226ME44L, Termination=SMD/SMT, Thickness=0.057inch, Voltage Rating=25V, Voltage Rating (DC)=25V, Weight=0.000335oz, Width=1.25mm
C8 C25 C26 C27 C28 C39 C40 C50: library part CC0402JRNPO9BN200, "CAP CER 20PF 50V C0G/NPO 0402", Case Code (Imperial)=0402, Case Code (Metric)=1005, Dielectric=C0G, Manufacturer=Yageo, Max Operating Temperature=125°C, Min Operating Temperature=-55°C, Package Quantity=1, Supplier Part Number 1=311-1417-1-ND, Tolerance=5%, Voltage Rating=50V, Capacitance=20pF, Case/Package=0402, ComponentLink1Description=http://www.yageo.com/documents/recent/UPY-GP_NP0_16V-to-50V_16.pdf?src-supplier=Digi-Key, ComponentLink1URL=http://www.yageo.com/documents/recent/UPY-GP_NP0_16V-to-50V_16.pdf?src-supplier=Digi-Key, ComponentLink2Description=http://www.yageo.com/documents/recent/UPY-GP_NP0_16V-to-50V_16.pdf?src-supplier=Mouser, ComponentLink2URL=http://www.yageo.com/documents/recent/UPY-GP_NP0_16V-to-50V_16.pdf?src-supplier=Mouser, Composition=Ceramic, Depth=0.5mm, Lead Free="Lead Free", Length=1mm, Manufacturer Part Number=CC0402JRNPO9BN200, Mount="Surface Mount", Number of Pins=2, Packaging="Tape and Reel", Pricing 1="1=0.1, 10=0.036, 100=0.0162, 500=0.01156, 1000=0.00908, 2500=0.00825, 5000=0.00759 (USD)", REACH SVHC="No SVHC", Stock 1=453493, Supplier 1=Digi-Key, Termination=SMD/SMT, Thickness=0.022inch, Voltage Rating (DC)=50V, Weight=2.3E-05oz, Width=0.02inch
C9 C33: library part EDK105BBJ475MVLF, "16V 4.7uF ±20% 0402 Multilayer Ceramic Capacitors MLCC", Manufacturer="Taiyo Yuden", Manufacturer Part Number=EDK105BBJ475MVLF
C16 C32 C43 C45 C46 C51: library part CC0402KRX5R7BB105, "CAP CER 1UF 16V X5R 0402", Case Code (Imperial)=0402, Case Code (Metric)=1005, Dielectric=X5R, Manufacturer=Yageo, Max Operating Temperature=85°C, Min Operating Temperature=-55°C, Supplier Part Number 1=311-1691-6-ND, Tolerance=10%, Voltage Rating=16V, Capacitance=1uF, Case/Package=0402, ComponentLink1Description=http://www.yageo.com/documents/recent/UPY-GPHC_X5R_4V-to-50V_12.pdf?src-supplier=Avnet+Europe, ComponentLink1URL=http://www.yageo.com/documents/recent/UPY-GPHC_X5R_4V-to-50V_12.pdf?src-supplier=Avnet+Europe, Composition=Ceramic, Depth=0.5mm, Halogen Free="Halogen Free", Height=0.5mm, Lead Free="Lead Free", Length=1mm, Manufacturer Part Number=CC0402KRX5R7BB105, Mount="Surface Mount", Packaging="Tape and Reel", Pricing 1="1=0.36, 10=0.252, 100=0.1512, 500=0.1134, 1000=0.09576, 2500=0.09072, 5000=0.08568 (USD)", Radiation Hardening=No, Stock 1=1405667, Supplier 1=Digi-Key, Termination=SMD/SMT, Thickness=0.022inch, Voltage Rating (DC)=16V, Weight=2.3E-05oz, Width=0.02inch
C17: library part GRM155R61E225KE11D, "CAP CER 2.2UF 25V X5R 0402", Manufacturer=Murata, Manufacturer Part Number=GRM155R61E225KE11D
C37: library part GCM1555C1H101JA16D, "0402 100 pF 50 V ±5 % Tolerance C0G SMT Multilayer Ceramic Capacitor", Case Code (Imperial)=0402, Case Code (Metric)=1005, Dielectric=C0G, Manufacturer=Murata, Max Operating Temperature=125°C, Min Operating Temperature=-55°C, Package Quantity=10000, Ratings=AEC-Q200, Tolerance=5%, Voltage=50V, Capacitance=100pF, Case/Package=0402, Category="Ceramic Capacitors", ComponentLink1Description=https://datasheet.ciiva.com/26889/getdatasheetpartid-748988-26889122.pdf?src-supplier=Verical, ComponentLink1URL=https://datasheet.ciiva.com/26889/getdatasheetpartid-748988-26889122.pdf?src-supplier=Verical, Depth=0.5mm, Height=0.5mm, Lead Free="Lead Free", Length=1mm, Manufacturer Part Number=GCM1555C1H101JA16D, Mount="Surface Mount", Packaging="Tape and Reel", Pricing 1="10000=0.00290 (USD)", Radiation Hardening=No, REACH SVHC="No SVHC", RoHS=Yes, RoHS Compliant=Yes, Stock 1=4560000, Supplier 1="Arrow Electronics", Supplier Part Number 1=GCM1555C1H101JA16D, Termination=SMD/SMT, Thickness=0.022inch, Voltage Rating=50V, Voltage Rating (DC)=50V, Weight=0.000212oz, Width=0.02inch
C38: library part GJM1555C1HR80WB01D, "CAP CER 0.8PF 50V C0G/NP0 0402", Case Code (Imperial)=0402, Case Code (Metric)=1005, Dielectric=C0G, Manufacturer=Murata, Max Operating Temperature=125°C, Min Operating Temperature=-55°C, Package Quantity=10000, Voltage Rating=50V, Capacitance=0.8pF, Case/Package=0402, Category="Ceramic Capacitors", ComponentLink1Description=https://datasheet.ciiva.com/170/product-170100.pdf?src-supplier=Digi-Key, ComponentLink1URL=https://datasheet.ciiva.com/170/product-170100.pdf?src-supplier=Digi-Key, ComponentLink2Description=https://datasheet.ciiva.com/11616/product-11616842.pdf?src-supplier=Avnet, ComponentLink2URL=https://datasheet.ciiva.com/11616/product-11616842.pdf?src-supplier=Avnet, Construction=Flat, Depth=0.5mm, Height=0.5mm, Length=1mm, Manufacturer Part Number=GJM1555C1HR80WB01D, Mount="Surface Mount", Packaging="Tape and Reel", Pricing 1="10000=0.04420, 20000=0.03850 (USD)", Radiation Hardening=No, RoHS=Yes, RoHS Compliant=Yes, Series=GJM, Stock 1=5080000, Supplier 1="Arrow Electronics", Supplier Part Number 1=GJM1555C1HR80WB01D, Termination=SMD/SMT, Thickness=0.022inch, Voltage Rating (DC)=50V, Width=0.02inch
C44: library part CC0402KRX7R8BB102, "CAP CER 1000PF 25V X7R 0402", Case Code (Imperial)=0402, Case Code (Metric)=1005, Dielectric=X7R, Insulation Resistance=10GR, Manufacturer=Yageo, Max Operating Temperature=125°C, Min Operating Temperature=-55°C, Tolerance=10%, Voltage Rating=25V, Capacitance=1nF, Case/Package=0402, Category="Ceramic Capacitors", ComponentLink1Description=https://datasheet.ciiva.com/26862/getdatasheetpartid-639817-26862638.pdf?src-supplier=Verical, ComponentLink1URL=https://datasheet.ciiva.com/26862/getdatasheetpartid-639817-26862638.pdf?src-supplier=Verical, ComponentLink2Description=https://datasheet.ciiva.com/5425/upy-gp-np0-16v-to-50v-8-3714-5425527.pdf?src-supplier=Mouser, ComponentLink2URL=https://datasheet.ciiva.com/5425/upy-gp-np0-16v-to-50v-8-3714-5425527.pdf?src-supplier=Mouser, Depth=0.5mm, Dissipation Factor=2.5%, Halogen Free="Halogen Free", Lead Free="Lead Free", Length=1mm, Manufacturer Part Number=CC0402KRX7R8BB102, Mount="Surface Mount", Number of Pins=2, Packaging="Tape and Reel", Pricing 1="1=0.00230, 10000=0.00230, 100001=0.00190 (USD)", Radiation Hardening=No, RoHS=Yes, RoHS Compliant=Yes, Series=CC, Stock 1=370000, Supplier 1="Arrow Electronics", Supplier Part Number 1=CC0402KRX7R8BB102, Termination=SMD/SMT, Thickness=0.022inch, Voltage Rating (DC)=25V, Width=0.02inch
D1: "DIODE ZENER 5.1V 500MW SOD123", Breakdown Voltage=5.36V, Case/Package=SOD-123-2, Forward Voltage=900mV, LCSC Part Number=C236187, Manufacturer="ON Semiconductor", Max Operating Temperature=150°C, Max Power Dissipation=500mW, Max Reverse Current=50uA, Max Reverse Leakage Current=10uA, Min Operating Temperature=-55°C, Package Quantity=1, Tolerance=5%, Voltage Rating (DC)=5.1V, ComponentLink1Description=https://datasheet.ciiva.com/15141/getdatasheetpartid-37234-15141921.pdf?src-supplier=Verical, ComponentLink1URL=https://datasheet.ciiva.com/15141/getdatasheetpartid-37234-15141921.pdf?src-supplier=Verical, ComponentLink2Description=https://datasheet.ciiva.com/8347/mmsz4678t1-d-8347996.pdf?src-supplier=Avnet, ComponentLink2URL=https://datasheet.ciiva.com/8347/mmsz4678t1-d-8347996.pdf?src-supplier=Avnet, ComponentLink3Description=https://datasheet.ciiva.com/894/mmsz4678t1-d-894948.pdf?src-supplier=Digikey, ComponentLink3URL=https://datasheet.ciiva.com/894/mmsz4678t1-d-894948.pdf?src-supplier=Digikey, ComponentLink4Description=https://datasheet.ciiva.com/894/mmsz4678t1-d-894949.pdf?src-supplier=Digikey, ComponentLink4URL=https://datasheet.ciiva.com/894/mmsz4678t1-d-894949.pdf?src-supplier=Digikey, ComponentLink5Description=https://datasheet.ciiva.com/894/mmsz4678t1-d-894947.pdf?src-supplier=Digikey, ComponentLink5URL=https://datasheet.ciiva.com/894/mmsz4678t1-d-894947.pdf?src-supplier=Digikey, ComponentLink6Description=https://datasheet.ciiva.com/8026/mmsz4678t1-d-8026838.pdf?src-supplier=Element14, ComponentLink6URL=https://datasheet.ciiva.com/8026/mmsz4678t1-d-8026838.pdf?src-supplier=Element14, ComponentLink7Description=https://datasheet.ciiva.com/22697/1796559-22697915.pdf?src-supplier=Element14, ComponentLink7URL=https://datasheet.ciiva.com/22697/1796559-22697915.pdf?src-supplier=Element14, ComponentLink8Description=https://datasheet.ciiva.com/27054/1925110-27054860.pdf?src-supplier=Jameco, ComponentLink8URL=https://datasheet.ciiva.com/27054/1925110-27054860.pdf?src-supplier=Jameco, Height=1.12mm, Item Type=Diode, Lead Free="Lead Free", Length=2.69mm, Manufacturer Part Number=MMSZ4689T1G, Material=Plastic, Max Breakdown Voltage=5.36V, Packaging="Tape and Reel", Pins=2, Power Dissipation=500mW, Power Rating=500mW, Pricing="3000=0.0178, 9000=0.0172, 30000=0.0165, 60000=0.0161, 120000=0.0154 (USD)", Radiation Hardening=No, Reach SVHC Compliant=No, RoHS=Yes, RoHS Compliant=Yes, Stock=105000, Supplier="Future Electronics", Termination=SMD/SMT, Test Current=50uA, Voltage Tolerance=5%, Width=1.6mm, Working Voltage=5.1V, Zener Current=50uA, Zener Voltage=5.1V
J1: "CONN U.FL RCPT STR 50 OHM SMD", Case/Package=SMD/SMT, Manufacturer=Hirose, Package Quantity=10000, Supplier Part Number 1=U.FL-R-SMT-1(80)-CUTT, ComponentLink1Description=https://www.hirose.com/product/en/download_file/key_name/U.FL-R-SMT-1%2880%29/category/Specification%20Sheet/doc_file_id/37638/?file_category_id=9&item_id=03310472280&is_series=&src-supplier=Digi-Key, ComponentLink1URL=https://www.hirose.com/product/en/download_file/key_name/U.FL-R-SMT-1%2880%29/category/Specification%20Sheet/doc_file_id/37638/?file_category_id=9&item_id=03310472280&is_series=&src-supplier=Digi-Key, ComponentLink2Description=http://www.mouser.com/ds/2/185/U.FL_catalog-939761.pdf?src-supplier=Mouser, ComponentLink2URL=http://www.mouser.com/ds/2/185/U.FL_catalog-939761.pdf?src-supplier=Mouser, Lead Free="Lead Free", Manufacturer Part Number=U.FL-R-SMT-1(80), Packaging="Tape and Reel", Pricing 1="1=1.07, 500=0.785, 1500=0.74, 2500=0.72, 5000=0.695 (USD)", Stock 1=1272, Supplier 1="Future Electronics"
J3: "CONN HEADER VERT 2POS 1.5MM", Color=White, Contact Resistance=30mR, Current Rating=1A, Flammability Rating="UL94 V-0", Housing Color=Beige, Insulation Color=Natural, Insulation Resistance=500MR, Manufacturer=JST, Max Operating Temperature=85°C, Max Voltage Rating (AC)=50V, Min Operating Temperature=-25°C, Supplier Part Number 1=455-1657-ND, Body Plating=Tin, Category="Board to Board Connectors", ComponentLink1Description=https://datasheet.ciiva.com/11752/0900766b8082f580-11752167.pdf?src-supplier=RSComponents, ComponentLink1URL=https://datasheet.ciiva.com/11752/0900766b8082f580-11752167.pdf?src-supplier=RSComponents, ComponentLink2Description=https://datasheet.ciiva.com/25616/0900766b81147f94-25616906.pdf?src-supplier=RSComponents, ComponentLink2URL=https://datasheet.ciiva.com/25616/0900766b81147f94-25616906.pdf?src-supplier=RSComponents, ComponentLink3Description=https://datasheet.ciiva.com/26894/getdatasheetpartid-643133-26894438.pdf?src-supplier=Verical, ComponentLink3URL=https://datasheet.ciiva.com/26894/getdatasheetpartid-643133-26894438.pdf?src-supplier=Verical, ComponentLink4Description=https://datasheet.ciiva.com/712/ezh-712443.pdf?src-supplier=Digi-Key, ComponentLink4URL=https://datasheet.ciiva.com/712/ezh-712443.pdf?src-supplier=Digi-Key, ComponentLink5Description=https://datasheet.ciiva.com/8052/80551-8052026.pdf?src-supplier=Element14, ComponentLink5URL=https://datasheet.ciiva.com/8052/80551-8052026.pdf?src-supplier=Element14, Connector Type=Header, Contact Finish - Mating=TIN, Contact Material=Brass,Copper,Tin, Contact Mating Length=0.094inch, Contact Plating=Copper,Tin, Contact Shape=Circular, Contact Type="Male Pin", Depth=3.5mm, Fastening Type=Detent, Gender=Male, Housing Material=Polyamide, Insulation Material=Nylon, Lead Free="Lead Free", Lead Pitch=1.5mm, Length=4.5mm, Manufacturer Part Number=B2B-ZR(LF)(SN), Material=Nylon, Max Current Rating=1A, Mount="Through Hole", Number of Contacts=2, Number of Positions=2, Number of Rows=1, Orientation=Straight, Packaging=Bulk, Panel Thickness=3.5mm, Pitch=1.5mm, Pricing 1="1=0.17000, 10=0.13500, 100=0.09990, 500=0.08270, 1000=0.07237, 5000=0.06203, 10000=0.06031 (USD)", REACH SVHC="No SVHC", RoHS=Yes, Series=ZH, Stock 1=113095, Supplier 1=Digi-Key, Termination=Solder, Voltage Rating=50V, Voltage Rating (AC)=50V, Voltage Rating (DC)=50V
J4: "CONN RCP USB3.1 TYPEC 24P SMD RA", Current Rating=1.25A, Flammability Rating="UL94 V-0", Insulation Color=Black, Manufacturer="TE Connectivity AMP", Max Operating Temperature=85°C, Min Operating Temperature=-40°C, Ratings=Waterproof, Supplier Part Number 1=A132569CT-ND, Voltage Rating=30V, Category="USB Connectors", ComponentLink1Description=http://www.farnell.com/datasheets/2611889.pdf?src-supplier=Farnell, ComponentLink1URL=http://www.farnell.com/datasheets/2611889.pdf?src-supplier=Farnell, ComponentLink2Description=https://www.te.com/commerce/DocumentDelivery/DDEController?Action=srchrtrv&DocNm=2305018&DocType=Customer+Drawing&DocLang=English&src-supplier=Digi-Key, ComponentLink2URL=https://www.te.com/commerce/DocumentDelivery/DDEController?Action=srchrtrv&DocNm=2305018&DocType=Customer+Drawing&DocLang=English&src-supplier=Digi-Key, ComponentLink3Description=http://www.farnell.com/datasheets/2611889.pdf?src-supplier=Newark, ComponentLink3URL=http://www.farnell.com/datasheets/2611889.pdf?src-supplier=Newark, Connector Type=USB, Contact Plating=Gold, Gender=Receptacle, Manufacturer Part Number=2305018-2, Mount="Surface Mount,Through Hole", Number of Contacts=24, Number of Ports=1, Packaging="Tape and Reel", Pricing 1="1=3.00000, 10=2.87800, 25=2.63840, 50=2.51840, 100=2.39840, 250=2.09864 (USD)", RoHS=Yes, RoHS Compliant=Yes, Shielding=Shielded, Stock 1=4590, Supplier 1=Digi-Key, Termination=Solder
J5: "CONN HEADER VERT 8POS 2.54MM", Color=Black, Manufacturer="Wurth Electronics", Supplier Part Number 1=732-5321-ND, ComponentLink1Description=http://www.farnell.com/cad/1737268.pdf?src-supplier=Element14, ComponentLink1URL=http://www.farnell.com/cad/1737268.pdf?src-supplier=Element14, ComponentLink2Description=https://katalog.we-online.de/em/datasheet/6130xx11121.pdf?src-supplier=Digi-Key, ComponentLink2URL=https://katalog.we-online.de/em/datasheet/6130xx11121.pdf?src-supplier=Digi-Key, Connector Type="Male Pin", Contact Material=Copper, Contact Mating Length=0.236inch, Contact Plating=Gold, Gender=Male, Manufacturer Part Number=61300811121, Mount="Through Hole", Number of Contacts=8, Number of Positions=8, Number of Rows=1, Packaging=Bulk, Pitch=0.1inch, Pricing 1="1=0.37, 10=0.315, 25=0.2632, 50=0.219, 100=0.199, 1000=0.181 (USD)", REACH SVHC=Unknown, Stock 1=7405, Supplier 1=Digi-Key, Termination=Solder
J6: "-40℃~+80℃ 15P Dual-sided contacts / top and bottom connection 0.5mm SMD,P=0.5mm,Surface Mount，Right Angle FFC, FPC (Flat Flexible) Connector Assemblies ROHS", LCSC Part Number=C19188796, Manufacturer=DIANWEI, Package="SMD,P=0.5mm,Surface Mount，Right Angle", ComponentLink1Description=LCSC, ComponentLink1URL=https://www.lcsc.com/product-detail/FFC-FPC-Flat-Flexible-Connector-Assemblies_DIANWEI-8-01A0-015200_C19188796.html?s_z=n_HC-FPC-05-20-15RLTAG, Item Type="FFC, FPC Connector", Manufacturer Part Number=8.01A0.015200
J7: "CONN HEADER VERT 4POS 2.54MM", Color=Black, Manufacturer="Wurth Electronics", Supplier Part Number 1=732-5317-ND, ComponentLink1Description=http://www.farnell.com/cad/1737268.pdf?src-supplier=Element14, ComponentLink1URL=http://www.farnell.com/cad/1737268.pdf?src-supplier=Element14, ComponentLink2Description=https://katalog.we-online.de/em/datasheet/6130xx11121.pdf?src-supplier=Digi-Key, ComponentLink2URL=https://katalog.we-online.de/em/datasheet/6130xx11121.pdf?src-supplier=Digi-Key, Connector Type="Male Pin", Contact Material=Copper, Contact Mating Length=0.236inch, Contact Plating=Gold, Gender=Male, Lead Free="Lead Free", Manufacturer Part Number=61300411121, Mount="Through Hole", Number of Contacts=4, Number of Positions=4, Number of Rows=1, Packaging=Bulk, Pitch=0.1inch, Pricing 1="1=0.18, 10=0.153, 25=0.1272, 50=0.106, 100=0.096, 1000=0.088 (USD)", REACH SVHC=Unknown, Stock 1=20544, Supplier 1=Digi-Key, Termination=Solder
L1: library part MAKK2016T2R2M, "FIXED IND 2.2UH 1.5A 160MOHM SMD", Case Code (Imperial)=0806, Case Code (Metric)=2016, Current Rating=1.5A, DC Resistance (DCR)=160mR, Manufacturer="Taiyo Yuden", Max Operating Temperature=105°C, Min Operating Temperature=-40°C, Package Quantity=3000, Resistor Type=Wirewound, Supplier Part Number 1=963-MAKK2016T2R2M, Test Frequency=2MHz, Tolerance=20%, Case/Package=0806, Category="Fixed Inductors", ComponentLink1Description=https://datasheet.ciiva.com/30014/makk2016t2r2m-ss-30014449.pdf?src-supplier=Avnet, ComponentLink1URL=https://datasheet.ciiva.com/30014/makk2016t2r2m-ss-30014449.pdf?src-supplier=Avnet, Core Material=Metal, Depth=1.6mm, Halogen Free="Halogen Free", Height=1mm, Height - Seated (Max)=0.039inch, Inductance=2.2uH, Length=0.079inch, Manufacturer Part Number=MAKK2016T2R2M, Max DC Current=1.5A, Mount="Surface Mount", Packaging="Tape and Reel", Pricing 1="1=0.27000, 10=0.17200, 50=0.17200, 100=0.14000, 1000=0.10600, 10000=0.09200 (USD)", Radiation Hardening=No, RoHS=Yes, RoHS Compliant=Yes, Saturation Current=1.5A, Shielding=Shielded, Stock 1=64320, Supplier 1=Mouser, Termination=SMD/SMT, Width=0.063inch
L3: library part MGFL2012F100MT-LF, "500mA 10uH ±20% 320mΩ 0805 Inductors (SMD) ROHS", Manufacturer=microgate, Manufacturer Part Number=MGFL2012F100MT-LF
L4: library part CS0402-15NH-S, "560mA 15nH ±3% 170mΩ 0402 Inductors (SMD) ROHS", LCSC Part Number=C329619, Manufacturer="Chilisin Elec", Package=0402, ComponentLink1Description=LCSC, ComponentLink1URL=https://www.lcsc.com/product-detail/Inductors-SMD_Chilisin-Elec-CS0402-15NH-S_C329619.html, Item Type=Inductor, Manufacturer Part Number=CS0402-15NH-S
L5: library part LQW18AN3N9C10D, "Inductor RF Chip Wirewound 3.9nH 0.2nH 100MHz 38Q-Factor 1A 32mOhm DCR 0603 Paper T/R", Case Code (Imperial)=0603, Case Code (Metric)=1608, Current Rating=1A, DC Resistance (DCR)=32mR, Manufacturer=Murata, Max Operating Temperature=125°C, Min Operating Temperature=-55°C, Package Quantity=4000, Resistor Type=Wirewound, Self Resonant Frequency=11GHz, Supplier Part Number 1=7242951, Test Frequency=100MHz, Case/Package=0603, Category="Fixed Inductors", ComponentLink1Description=https://datasheet.ciiva.com/11799/0900766b80a002db-11799288.pdf?src-supplier=RSComponents, ComponentLink1URL=https://datasheet.ciiva.com/11799/0900766b80a002db-11799288.pdf?src-supplier=RSComponents, ComponentLink2Description=https://datasheet.ciiva.com/6705/l0075s0080lqw18a-10-6705579.pdf?src-supplier=Digi-Key, ComponentLink2URL=https://datasheet.ciiva.com/6705/l0075s0080lqw18a-10-6705579.pdf?src-supplier=Digi-Key, ComponentLink3Description=https://datasheet.ciiva.com/6705/l0075s0080lqw18a-10-6705577.pdf?src-supplier=Digi-Key, ComponentLink3URL=https://datasheet.ciiva.com/6705/l0075s0080lqw18a-10-6705577.pdf?src-supplier=Digi-Key, ComponentLink4Description=https://datasheet.ciiva.com/6705/l0075s0080lqw18a-10-6705578.pdf?src-supplier=Digi-Key, ComponentLink4URL=https://datasheet.ciiva.com/6705/l0075s0080lqw18a-10-6705578.pdf?src-supplier=Digi-Key, ComponentLink5Description=https://datasheet.ciiva.com/4976/product-4976636.pdf?src-supplier=Mouser, ComponentLink5URL=https://datasheet.ciiva.com/4976/product-4976636.pdf?src-supplier=Mouser, Core Material=Non-Magnetic, DC Current=1A, Depth=1.1mm, Height=0.8mm, Height - Seated (Max)=0.039inch, Inductance=3.9nH, Length=1.6mm, Manufacturer Part Number=LQW18AN3N9C10D, Max DC Current=1A, Military Standard=Not, Mount="Surface Mount", Packaging="Tape and Reel", Pricing 1="10=0.16800 (USD)", Q Factor=38, Radiation Hardening=No, REACH SVHC="No SVHC", RoHS=Yes, RoHS Compliant=Yes, Series=LQW18A_10, Shielding=Unshielded, Stock 1=1, Supplier 1=RSComponents, Termination=SMD/SMT, Weight=0.000106oz, Width=0.031inch
L6: "FERRITE BEAD 30 OHM 0603 1LN / Ferrite Beads Multi-Layer 30Ohm 100MHz 1A 0.05Ohm DCR 0603 T/R", Case Code (Imperial)=0603, Case Code (Metric)=1608, Current Rating=1A, DC Resistance (DCR)=50mR, Frequency=100MHz, Manufacturer=Murata, Max Operating Temperature=125°C, Min Operating Temperature=-55°C, Package Quantity=4000, Supplier Part Number 1=7241403, Tolerance=25%, Case/Package=0603, Category=Inductors, ComponentLink1Description=https://datasheet.ciiva.com/19460/1845048-19460200.pdf?src-supplier=Jameco, ComponentLink1URL=https://datasheet.ciiva.com/19460/1845048-19460200.pdf?src-supplier=Jameco, ComponentLink2Description=https://datasheet.ciiva.com/11800/0900766b81275ca5-11800868.pdf?src-supplier=RSComponents, ComponentLink2URL=https://datasheet.ciiva.com/11800/0900766b81275ca5-11800868.pdf?src-supplier=RSComponents, ComponentLink3Description=https://datasheet.ciiva.com/8021/5148-8021484.pdf?src-supplier=Element14, ComponentLink3URL=https://datasheet.ciiva.com/8021/5148-8021484.pdf?src-supplier=Element14, ComponentLink4Description=https://datasheet.ciiva.com/8021/5148-8021486.pdf?src-supplier=Element14, ComponentLink4URL=https://datasheet.ciiva.com/8021/5148-8021486.pdf?src-supplier=Element14, ComponentLink5Description=https://datasheet.ciiva.com/1012/l0110s0100blm18p-1012120.pdf?src-supplier=Digi-Key, ComponentLink5URL=https://datasheet.ciiva.com/1012/l0110s0100blm18p-1012120.pdf?src-supplier=Digi-Key, ComponentLink6Description=https://datasheet.ciiva.com/1012/l0110s0100blm18p-1012119.pdf?src-supplier=Digi-Key, ComponentLink6URL=https://datasheet.ciiva.com/1012/l0110s0100blm18p-1012119.pdf?src-supplier=Digi-Key, ComponentLink7Description=https://datasheet.ciiva.com/1012/l0110s0100blm18p-1012121.pdf?src-supplier=Digi-Key, ComponentLink7URL=https://datasheet.ciiva.com/1012/l0110s0100blm18p-1012121.pdf?src-supplier=Digi-Key, ComponentLink8Description=https://datasheet.ciiva.com/3081/l0110s0100blm18p-3081636.pdf?src-supplier=Avnet, ComponentLink8URL=https://datasheet.ciiva.com/3081/l0110s0100blm18p-3081636.pdf?src-supplier=Avnet, Core Material=Ferrite, DC Current=1A, DC Resistance-Max=50mR, Depth=0.8mm, Height=0.8mm, Impedance=30R, Lead Free="Lead Free", Length=1.6mm, Manufacturer Part Number=BLM18PG300SN1D, Material=Steel,Ferrite, Max Current Rating=1A, Max DC Current=1A, Number of Circuits=1, Number of Lines=1, Number of Pins=2, Packaging="Tape and Reel", Pricing 1="25=0.07200, 1000=0.06200, 2000=0.05400, 5000=0.04700, 10000=0.04300 (GBP)", Radiation Hardening=No, REACH SVHC="No SVHC", RoHS=Yes, RoHS Compliant=Yes, Series=BLM18P, Shielding=Unshielded, Stock 1=3100, Supplier 1=RSComponents, Termination=SMD/SMT, Test Frequency=100MHz, Width=0.8mm
L8: library part LVC505040-6R8M-N, "2.7A 6.8uH ±20% 50mΩ SMD Power Inductors ROHS", Manufacturer="Chlisin Elec", ComponentLink1Description=LCSC, ComponentLink1URL=https://www.lcsc.com/product-detail/Power-Inductors_Chilisin-Elec-LVC505040-6R8M-N_C285870.html, Manufacturer Part Number=LVC505040-6R8M-N
LED1 LED3: "LED GREEN CLEAR CHIP SMD", Case Code (Imperial)=0402, Case Code (Metric)=1005, Color=Green, Forward Voltage=2.1V, Lens Color=Colorless, Manufacturer=SunLED, Supplier Part Number 1=1497-1219-6-ND, Test Current=20mA, Case/Package=0402, ComponentLink1Description=http://www.sunledusa.com/products/spec/XZVG68W-2.pdf?src-supplier=Digi-Key, ComponentLink1URL=http://www.sunledusa.com/products/spec/XZVG68W-2.pdf?src-supplier=Digi-Key, ComponentLink2Description=https://www.sunledusa.com/products/spec/XZVG68W-2.pdf?src-supplier=Digi-Key, ComponentLink2URL=https://www.sunledusa.com/products/spec/XZVG68W-2.pdf?src-supplier=Digi-Key, Dominant Wavelength=570nm, Height=0.6mm, Length=1mm, Lens Transparency=Clear, Luminous Intensity=49mcd, Manufacturer Part Number=XZVG68W-2, Mount="Surface Mount", Packaging="Tape and Reel", Pricing 1="1=0.5, 10=0.36, 100=0.16, 500=0.112, 1000=0.092 (USD)", Stock 1=4185, Supplier 1=Digi-Key, Viewing Angle=120°, Width=0.5mm
LED2: "LED RED CLEAR CHIP SMD", Case Code (Imperial)=0402, Case Code (Metric)=1005, Color=Red, Forward Voltage=1.95V, Lens Color=Colorless, Manufacturer=SunLED, Supplier Part Number 1=1497-1174-6-ND, Test Current=20mA, Case/Package=0402, ComponentLink1Description=http://www.sunledusa.com/products/spec/XZMDK68W-2.pdf?src-supplier=Digi-Key, ComponentLink1URL=http://www.sunledusa.com/products/spec/XZMDK68W-2.pdf?src-supplier=Digi-Key, ComponentLink2Description=https://www.sunledusa.com/products/spec/XZMDK68W-2.pdf?src-supplier=Digi-Key, ComponentLink2URL=https://www.sunledusa.com/products/spec/XZMDK68W-2.pdf?src-supplier=Digi-Key, Dominant Wavelength=630nm, Height=0.6mm, Length=1mm, Lens Transparency=Clear, Luminous Intensity=69mcd, Manufacturer Part Number=XZMDK68W-2, Mount="Surface Mount", Packaging="Tape and Reel", Pricing 1="1=0.43, 10=0.306, 100=0.136, 500=0.0952, 1000=0.0782 (USD)", Stock 1=69539, Supplier 1=Digi-Key, Viewing Angle=120°, Width=0.5mm
R1: library part 0805W8F250MT5E, "RES SMD 25m Ohms 125mW 0805", Manufacturer="UNI-Royal Elec", Overload Voltage (Max)=150V, Resistance=25mOhm, Temperature Coefficient=±800ppm/℃, Tolerance=±1%, ComponentLink1Description=LCSC, ComponentLink1URL=https://lcsc.com/product-detail/Chip-Resistor-Surface-Mount_UNI-ROYAL-Uniroyal-Elec-0805W8F250MT5E_C620515.html, Type="Thick Film Resistors"